# Altium PCB Driver.PcbDoc (part 4 of 4)
Units mm, origin at the board's own origin, x right, y up, seen from the top; angles counter-clockwise.
Board outline 200.2 x 290.2 mm, 2 copper layers (Top Layer, Bottom Layer), stack 1.371 mm thick; 539 components, 196 nets, 1470 pads, 343 vias.
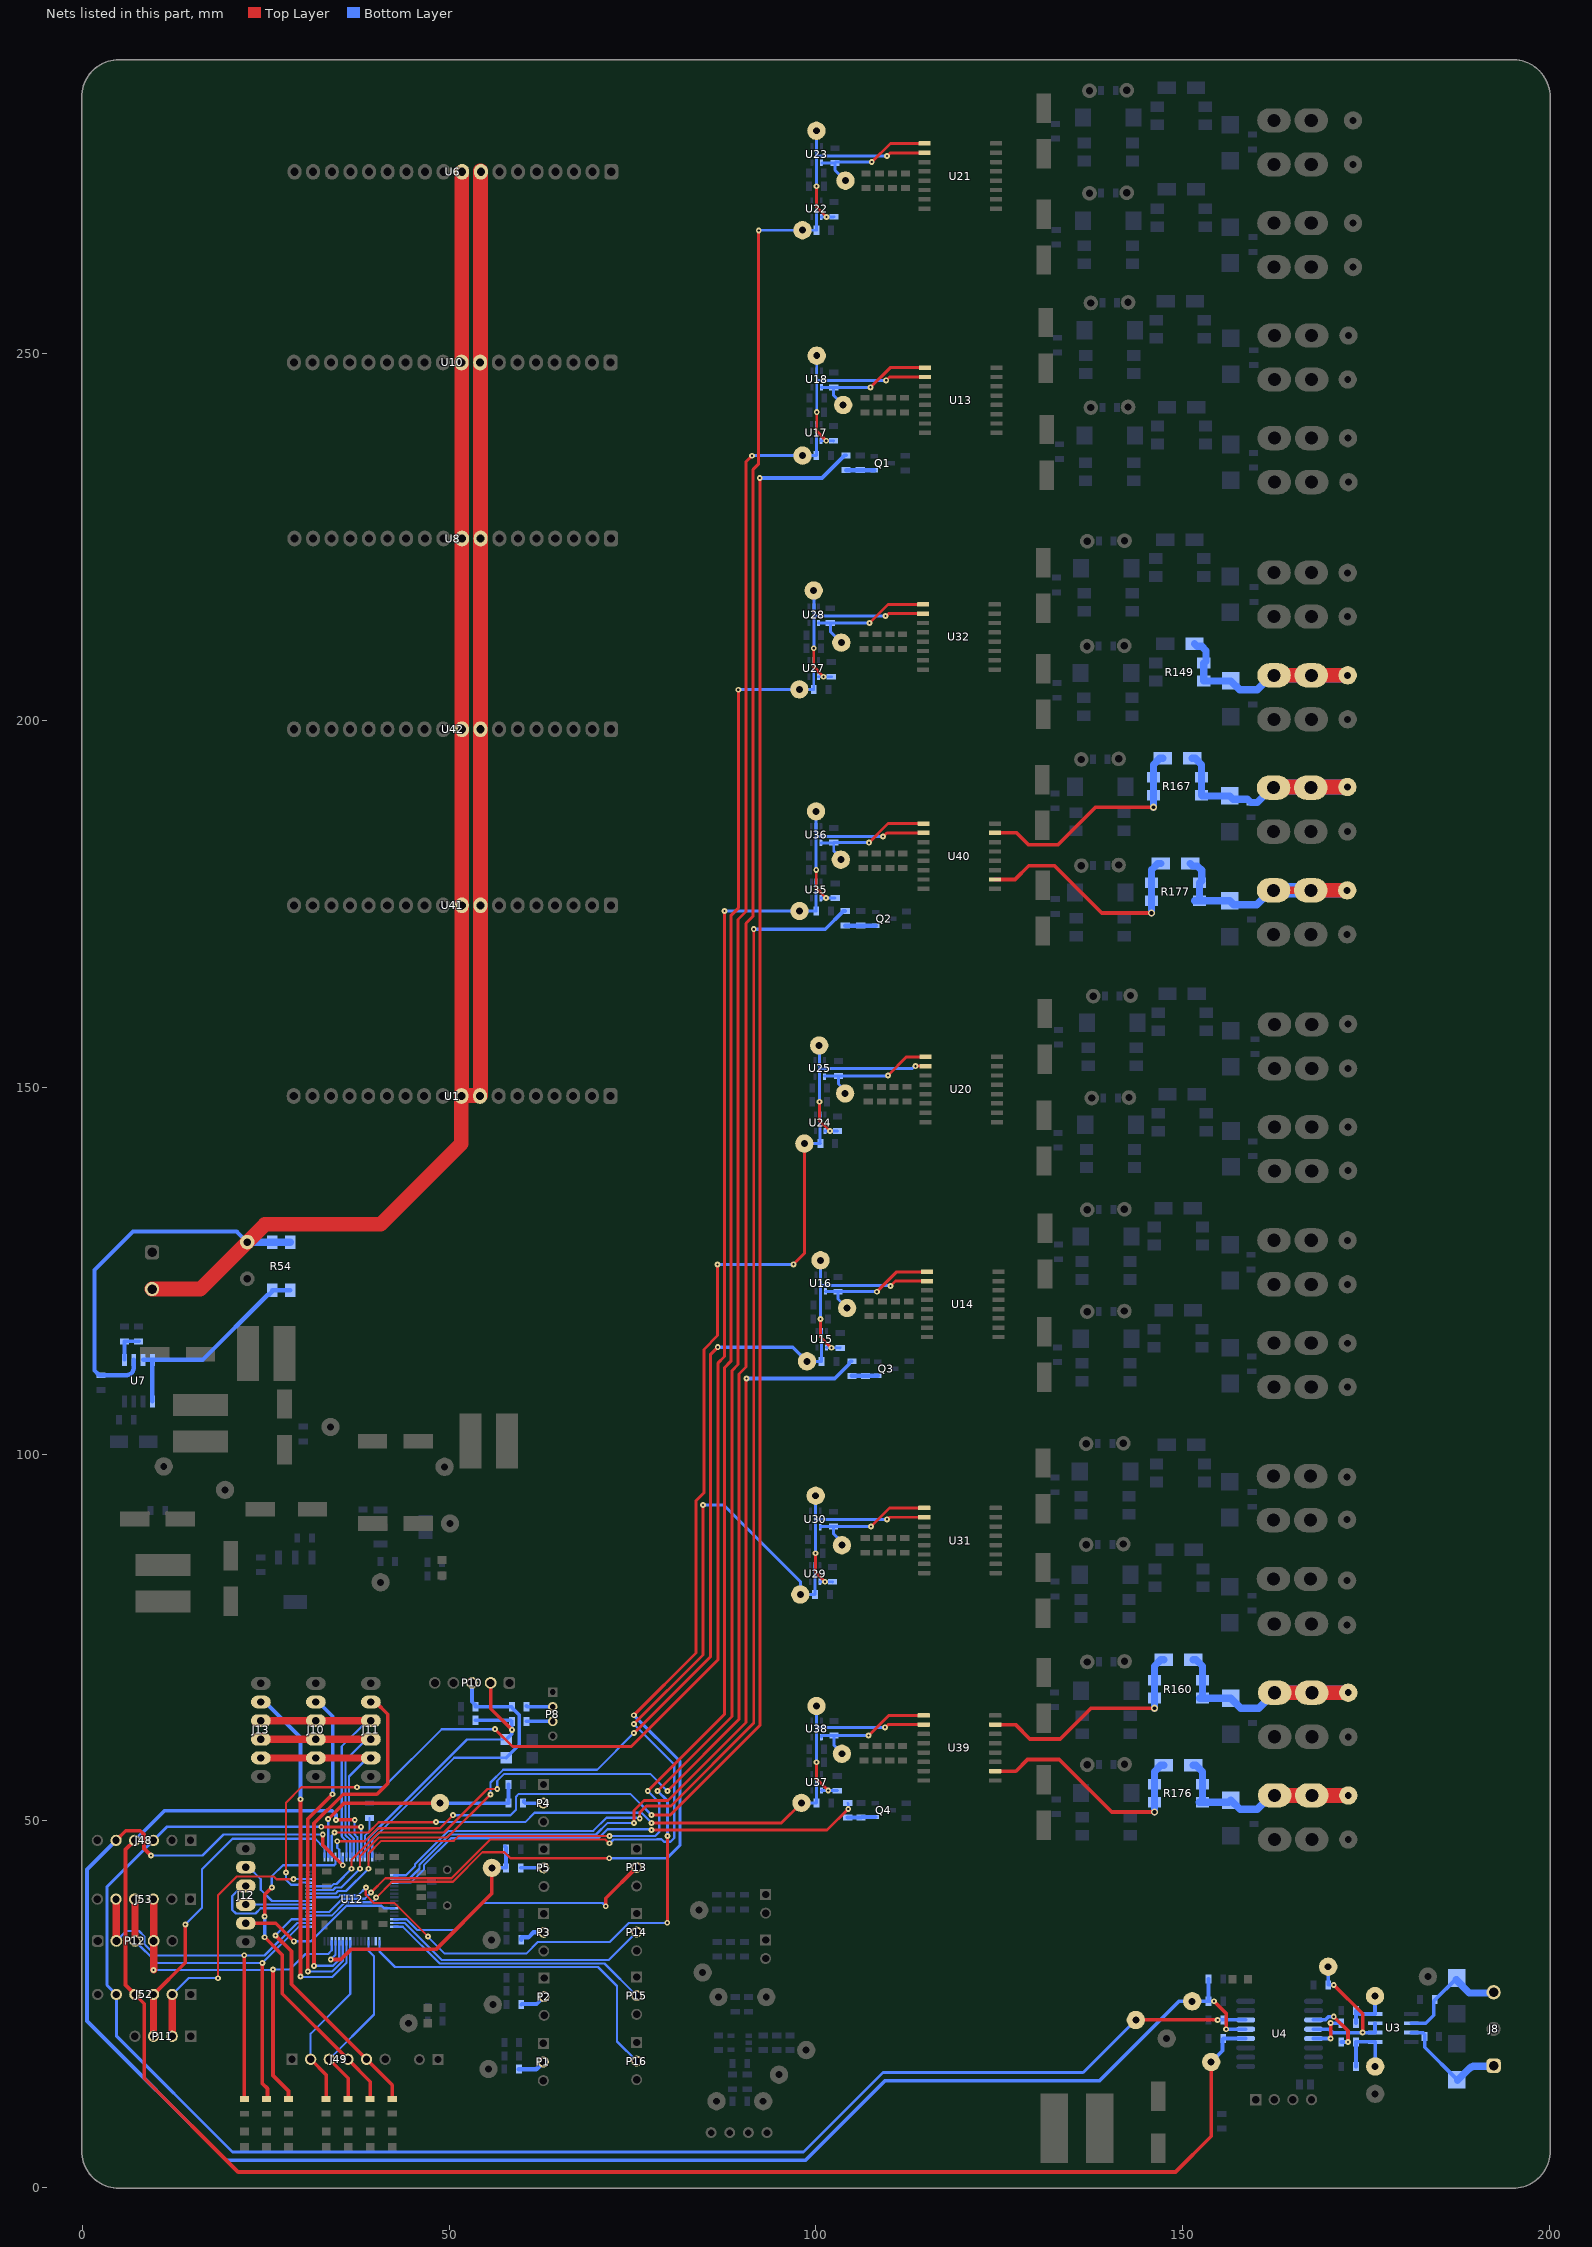
[diagram p4: the nets of this part, all layers, seen from the top]

## Via types
v1: diameter 0.8, hole 0.3, Top Layer to Bottom Layer, tented both sides, 172 vias
v2: diameter 1, hole 0.5, Top Layer to Bottom Layer, tented both sides, 129 vias
v3: diameter 0.8, hole 0.4, Top Layer to Bottom Layer, tented both sides, 25 vias
v4: diameter 2, hole 1, Top Layer to Bottom Layer, tented both sides, 11 vias
v5: diameter 0.8, hole 0.4, Top Layer to Bottom Layer, 3 vias
v6: diameter 1, hole 0.5, Top Layer to Bottom Layer, 1 vias
v7: diameter 0.7, hole 0.3, Top Layer to Bottom Layer, tented both sides, 1 vias
v8: diameter 1.5, hole 1, Top Layer to Bottom Layer, tented both sides, 1 vias

## Nets (pads, with @x,y where several pads share a name; then routed paths per layer and width w, separated by ;. In a path a pad name is that pad's centre, name@x,y a point inside that pad or via, vN(x,y) a via of type N, cw(c..) or ccw(c..) an arc to the next point about the centre after c; other vN are vias at no path point) (continued)
NetD24_2: D24.2 J38.1 R149.2 R152.2 TP86.1 VD25.2 | length 37.2
  Top Layer w2: J38.1@162.46,206.174 J38.1@167.54,206.174 TP86.1@172.5,206.174
  Bottom Layer w1: D24.2@151.61,210.464 151.96,210.114 152.584,210.114 153.17,209.528 153.17,208.064 152.945,207.839 R149.2@152.885,207.839 R149.2@152.885,205.389 156.535,205.389 VD25.2@156.55,205.404 157.77,204.184 R152.2@159.55,204.184 160.187,204.184 162.177,206.174 J38.1@162.46,206.174
  Bottom Layer w2: J38.1@162.46,206.174 J38.1@167.54,206.174 TP86.1@172.5,206.174
NetD25_1: D25.1 R160.1 U39.15 | length 31.7
  Top Layer w0.5: U39.15@124.369,63.12 U39.15@124.449,63.12 127.213,63.12 129.164,61.169 133.312,61.169 137.502,65.359 v2(146.149,65.359)
  Bottom Layer w1: v2(146.149,65.359) R160.1@146.149,66.74 R160.1@146.149,69.19 146.149,71.1 147.024,71.975 D25.1@147.424,71.975
NetD25_2: D25.2 J42.1 R160.2 R168.2 TP98.1 VD28.2 | length 37.8
  Top Layer w2: J42.1@162.534,67.465 J42.1@167.614,67.465 TP98.1@172.574,67.465
  Bottom Layer w1: D25.2@151.424,71.975 151.824,71.975 152.699,71.1 R160.2@152.699,66.74 R160.2@152.744,66.695 ; R160.2@152.314,66.695 VD28.2@156.574,66.695 157.914,65.355 R168.2@159.524,65.355 160.381,65.355 162.491,67.465 J42.1@162.534,67.465
  Bottom Layer w2: J42.1@162.534,67.465 J42.1@167.614,67.465 TP98.1@172.574,67.465
NetD26_1: D26.1 R167.1 U40.15 | length 31.8
  Top Layer w0.5: U40.15@124.428,184.689 127.358,184.689 128.973,183.074 133.019,183.074 138.119,188.174 v2(146.018,188.174)
  Bottom Layer w1: v2(146.018,188.174) R167.1@146.018,189.799 146.018,190.964 R167.1@146.018,192.249 146.018,193.979 146.893,194.854 D26.1@147.293,194.854
NetD26_2: D26.2 J43.1 R167.2 R170.2 TP99.1 VD29.2 | length 37.1
  Top Layer w1: J43.1@162.393,190.854 J43.1@162.473,190.934
  Top Layer w2: J43.1@162.473,190.934 TP99.1@172.453,190.934
  Bottom Layer w1: D26.2@151.293,194.854 151.693,194.854 152.568,193.979 R167.2@152.568,189.799 152.643,189.724 VD29.2@156.433,189.724 156.865,189.292 158.84,189.292 159.308,188.824 R170.2@159.333,188.824 160.16,188.824 162.19,190.854 J43.1@162.393,190.854
  Bottom Layer w2: J43.1@162.393,190.854 162.473,190.934 TP99.1@172.453,190.934
NetD27_1: D27.1 R176.1 U39.10 | length 32.5
  Top Layer w0.5: U39.10@124.369,56.77 U39.10@124.449,56.77 127.264,56.77 128.851,58.357 133.174,58.357 140.336,51.195 v2(146.149,51.195)
  Bottom Layer w1: v2(146.149,51.195) R176.1@146.149,52.54 R176.1@146.149,54.99 146.149,56.69 147.024,57.565 D27.1@147.424,57.565
NetD27_2: D27.2 J46.1 R176.2 R178.2 TP102.1 VD32.2 | length 37.5
  Top Layer w2: J46.1@162.534,53.465 J46.1@167.614,53.465 TP102.1@172.574,53.465
  Bottom Layer w1: D27.2@151.424,57.565 151.824,57.565 152.699,56.69 R176.2@152.699,52.54 ; R176.2@152.269,52.54 156.289,52.54 VD32.2@156.574,52.825 157.814,51.585 R178.2@159.714,51.585 160.162,51.585 162.042,53.465 J46.1@162.534,53.465
  Bottom Layer w2: J46.1@162.534,53.465 J46.1@167.614,53.465 TP102.1@172.574,53.465
NetD28_1: D28.1 R177.1 U40.10 | length 32.3
  Top Layer w0.5: U40.10@124.428,178.339 127.138,178.339 129.003,180.204 132.523,180.204 138.963,173.764 v2(145.748,173.764)
  Bottom Layer w1: v2(145.748,173.764) R177.1@145.748,175.449 R177.1@145.748,177.899 145.748,179.639 146.623,180.514 D28.1@147.023,180.514
NetD28_2: D28.2 J47.1 R177.2 R180.2 TP103.1 VD33.2 | length 38.1
  Top Layer w1: J47.1@162.393,176.854 J47.1@167.473,176.854
  Top Layer w2: J47.1@167.473,176.854 TP103.1@172.433,176.854
  Bottom Layer w1: D28.2@151.023,180.514 151.373,180.164 151.997,180.164 152.583,179.578 152.583,178.124 152.358,177.899 R177.2@152.298,177.899 R177.2@152.298,175.449 R177.2@152.313,175.434 ; R177.2@151.633,175.434 VD33.2@156.433,175.434 156.983,174.884 R180.2@159.403,174.884 160.1,174.884 162.07,176.854 J47.1@162.393,176.854
  Bottom Layer w2: J47.1@162.393,176.854 J47.1@167.473,176.854 TP103.1@172.433,176.854
NetJ8_1: J8.1 R41.2 U3.7 ZD2.1 | length 15.6
  Bottom Layer w0.5: U3.7@181.153,21.132 182.703,21.132 182.99,20.845 182.99,19.128 ZD2.1@187.388,14.731
  Bottom Layer w1: ZD2.1@187.477,14.642 188.001,15.166 189.08,16.245 cw(c189.786,15.537) 189.786,16.537 192.298,16.537 J8.1@192.388,16.627
NetJ8_3: J8.3 R24.1 U3.6 ZD1.1 | length 15.8
  Bottom Layer w0.5: U3.6@181.153,22.402 181.168,22.417 183.142,22.417 184.238,23.513 184.238,25.428 ZD1.1@187.388,28.578
  Bottom Layer w1: ZD1.1@187.301,28.318 189.081,26.537 192.298,26.537 J8.3@192.388,26.627
NetJ10_2: J10.2 J11.2 J13.2 U12.57 | length 30.3
  Top Layer w1: J13.2@24.328,58.577 J10.2@31.828,58.577 J11.2@39.328,58.577
  Bottom Layer w0.3: U12.57@37.007,45.076 37.007,47.584 36.355,48.237 36.355,56.059 38.872,58.577 J11.2@39.328,58.577
NetJ10_3: J10.3 J11.3 J13.3 U12.56 | length 33.1
  Top Layer w1: J13.3@24.328,61.117 J10.3@31.828,61.117 J11.3@39.328,61.117
  Bottom Layer w0.3: U12.56@36.507,45.076 36.507,47.406 35.875,48.038 35.875,58.25 38.742,61.117 J11.3@39.328,61.117
NetJ10_4: J10.4 J11.4 J13.4 U12.55 | length 35.8
  Top Layer w1: J13.4@24.328,63.657 J10.4@31.828,63.657 J11.4@39.328,63.657
  Bottom Layer w0.3: U12.55@36.007,45.076 36.007,47.227 35.395,47.839 35.395,47.886 35.355,47.926 35.355,60.155 38.857,63.657 J11.4@39.328,63.657
NetJ10_5: J10.5 U12.27 | length 47.3
  Top Layer w0.5: v1(30.732,29.482) 30.732,50.243 v1(34.112,53.624)
  Bottom Layer w0.3: v1(30.732,29.482) 34.107,29.482 35.507,30.882 U12.27@35.507,33.576 ; J10.5@31.828,66.197 J10.5@32.167,66.197
  Bottom Layer w0.5: J10.5@32.167,66.197 34.112,64.252 v1(34.112,53.624)
NetJ11_5: J11.5 U12.28 | length 50.4
  Top Layer w0.5: v1(31.582,30.232) 31.582,49.657 35.549,53.624 40.149,53.624 41.614,55.089 41.614,64.532 39.949,66.197 J11.5@39.328,66.197
  Bottom Layer w0.3: v1(31.582,30.232) 34.151,30.232 35.007,31.088 U12.28@35.007,33.576
NetJ12_2: J12.2 U12.40 | length 11.5
  Bottom Layer w0.3: J12.2@22.272,43.667 22.707,43.667 24.326,42.048 24.326,40.588 25.838,39.076 U12.40@31.007,39.076
NetJ12_3: J12.3 U12.38 | length 15.4
  Bottom Layer w0.3: J12.3@22.272,41.127 21.808,41.127 20.432,39.751 20.432,37.857 20.932,37.357 23.607,37.357 24.326,38.076 U12.38@31.007,38.076
NetJ12_4: J12.4 U12.39 | length 8.7
  Bottom Layer w0.3: J12.4@22.272,38.587 22.283,38.576 U12.39@31.007,38.576
NetJ12_5: J12.5 U12.11 | length 23.4
  Top Layer w0.5: J12.5@22.272,36.047 26.354,36.047 v1(28.825,33.576)
  Bottom Layer w0.3: v1(28.825,33.576) 31.159,33.576 36.007,38.424 40.796,38.424 40.992,38.228 41.144,38.076 U12.11@42.507,38.076
NetJ13_5: J13.5 U12.26 | length 50
  Top Layer w0.5: v1(29.725,52.95) 29.732,52.943 v1(29.732,28.782)
  Bottom Layer w0.3: J13.5@24.328,66.197 J13.5@24.892,66.197 ; v1(29.732,28.782) 29.807,28.707 34.057,28.707 36.007,30.657 U12.26@36.007,33.576
  Bottom Layer w0.5: J13.5@24.892,66.197 29.725,61.364 v1(29.725,52.95)
NetJ48_3: J48.3 J52.5 R25.1 TP14.1 U4.6 U12.59 | length 231
  Top Layer w0.4: v1(32.56,49.197) 32.575,49.182 v1(38.001,49.182)
  Top Layer w0.5: TP14.1@143.625,22.862 v1(154.772,22.862)
  Bottom Layer w0.3: v1(38.001,49.182) 38.007,49.176 U12.59@38.007,45.076
  Bottom Layer w0.4: v1(32.56,49.197) 11.532,49.197 J48.3@9.667,47.332 3.357,41.022 3.357,27.597 J52.5@4.622,26.332 4.622,20.703 20.475,4.85 98.325,4.85 109.15,15.675 136.432,15.675 TP14.1@143.607,22.85
  Bottom Layer w0.5: v1(154.772,22.862) R25.1@155.528,22.862 U4.6@158.593,22.862
NetJ48_4: J48.4 J52.4 R28.1 TP11.1 U4.4 U12.58 | length 241.5
  Top Layer w0.5: J48.4@7.127,47.332 5.882,46.087 5.882,27.612 J52.4@7.162,26.332 8.425,25.069 8.425,14.925 21.225,2.125 149.025,2.125 153.888,6.988 TP11.1@153.888,17.127 ; v1(34.581,50.133) v1(37.132,50.133)
  Bottom Layer w0.3: v1(37.132,50.133) 37.107,50.108 37.107,48.163 37.487,47.783 37.487,47.71 37.507,47.69 U12.58@37.507,45.076
  Bottom Layer w0.5: J48.4@7.127,47.332 11.152,51.357 34.077,51.357 34.581,50.853 v1(34.581,50.133) ; TP11.1@153.888,17.127 155.43,18.669 R28.1@155.43,20.224 ; R28.1@155.528,20.322 U4.4@158.593,20.322
NetJ48_5: J48.5 R39.2 R40.2 TP10.1 U4.5 U12.54 | length 245.8
  Top Layer w0.5: J48.5@4.587,47.332 5.905,48.65 7.879,48.65 8.397,48.132 8.397,46.228 v1(9.35,45.275) ; v1(32.771,48.146) 32.75,48.125 32.75,46.7 v1(35.5,43.95) ; v1(154.258,25.402) 155.928,23.732 v1(155.928,21.592)
  Bottom Layer w0.3: v1(9.35,45.275) 16.375,45.275 19.246,48.146 v1(32.771,48.146) ; v1(35.5,43.95) 35.505,43.955 35.505,45.074 U12.54@35.507,45.076
  Bottom Layer w0.5: J48.5@4.587,47.332 0.632,43.377 0.632,22.718 19.625,3.725 98.575,3.725 109.425,14.575 138.675,14.575 149.502,25.402 TP10.1@151.298,25.402 R40.2@153.528,25.402 ; R39.2@153.528,28.437 R40.2@153.528,25.402 ; v1(154.258,25.402) R40.2@153.528,25.402 ; v1(155.928,21.592) U4.5@158.593,21.592
NetJ49_2: J49.2 R13.2 U12.25 | length 24.6
  Top Layer w0.5: J49.2@31.117,17.496 33.257,15.356 R13.2@33.257,12.101
  Bottom Layer w0.3: J49.2@31.117,17.496 31.117,20.992 36.507,26.382 U12.25@36.507,33.576
NetJ49_3: J49.3 R12.2 U12.20 | length 25.4
  Top Layer w0.5: J49.3@33.657,17.496 36.257,14.896 R12.2@36.257,12.101
  Bottom Layer w0.3: J49.3@33.657,17.496 39.757,23.596 39.757,31.526 39.009,32.273 39.009,33.574 U12.20@39.007,33.576
NetJ49_4: J49.4 R11.2 U12.52 | length 47
  Top Layer w0.5: v1(24.85,34.126) 27.25,31.726 27.25,26.443 J49.4@36.197,17.496 39.257,14.436 R11.2@39.257,12.101 ; v1(24.85,36.975) 24.85,39.946 v1(25.828,40.924)
  Bottom Layer w0.3: v1(25.828,40.924) 25.828,42.429 27.349,43.95 34.331,43.95 34.507,44.126 U12.52@34.507,45.076
  Bottom Layer w0.5: v1(24.85,34.126) v1(24.85,36.975)
NetJ49_5: J49.5 R10.2 U12.35 | length 34.5
  Top Layer w0.5: v1(26.325,34.382) 28.5,32.207 28.5,27.733 J49.5@38.737,17.496 42.257,13.976 R10.2@42.257,12.101
  Bottom Layer w0.3: v1(26.325,34.382) 26.325,34.406 28.495,36.576 U12.35@31.007,36.576
NetJ52_2: J52.2 P11.2 U12.46 | length 37.9
  Top Layer w0.3: v1(18.5,28.55) 18.5,39.875 21.032,42.407 26.094,42.407 26.453,42.048 v1(28.775,42.048)
  Top Layer w1: P11.2@12.242,20.632 J52.2@12.242,26.332
  Bottom Layer w0.3: J52.2@12.242,26.332 14.467,28.557 18.493,28.557 v1(18.5,28.55) ; v1(28.775,42.048) 28.803,42.076 U12.46@31.007,42.076
NetJ52_3: J52.3 P11.3 U12.49 | length 45.7
  Top Layer w0.5: J52.3@9.702,26.332 14.032,30.662 v1(14.032,35.857)
  Top Layer w1: P11.3@9.702,20.632 J52.3@9.702,26.332
  Bottom Layer w0.3: v1(14.032,35.857) 16.287,38.112 16.287,43.362 20.475,47.55 31.76,47.55 33.007,46.303 U12.49@33.007,45.076
NetJ53_3: J53.3 P12.4 R7.2 U12.30 | length 54.9
  Top Layer w0.5: v1(25.982,29.732) 25.982,15.291 28.107,13.166 R7.2@28.107,12.076
  Top Layer w1: J53.3@9.657,39.332 9.717,39.272 P12.4@9.717,33.632 9.717,29.697 v1(9.702,29.682)
  Bottom Layer w0.3: v1(9.702,29.682) 25.932,29.682 v1(25.982,29.732) 28.282,29.732 30.407,31.857 33.509,31.857 34.007,32.355 U12.30@34.007,33.576
NetJ53_4: J53.4 P12.3 R8.2 U12.33 | length 51.8
  Top Layer w0.5: v1(24.529,30.607) 24.529,14.198 25.232,13.495 25.232,12.226 R8.2@25.081,12.076
  Top Layer w1: J53.4@7.117,39.332 7.177,39.272 P12.3@7.177,33.632
  Bottom Layer w0.3: P12.3@7.177,33.632 10.202,30.607 v1(24.529,30.607) 29.498,35.576 U12.33@31.007,35.576
NetJ53_5: J53.5 P12.2 R9.2 U12.34 | length 56.2
  Top Layer w0.5: R9.2@22.032,12.076 22.032,12.126 R9.2@22.081,12.076 ; R9.2@22.057,12.126 v1(22.057,31.682)
  Top Layer w1: J53.5@4.577,39.332 4.637,39.272 P12.2@4.637,33.632
  Bottom Layer w0.3: P12.2@4.637,33.632 5.982,34.977 7.723,34.977 8.447,34.253 8.447,33.211 10.026,31.632 22.007,31.632 v1(22.057,31.682) 22.107,31.632 24.832,31.632 29.276,36.076 U12.34@31.007,36.076
NetP1_2: P1.2 R1.1 | length 3.7
  Bottom Layer w0.6: R1.1@59.511,16.147 61.862,16.147 P1.2@62.842,17.127
NetP2_2: P2.2 R2.1 | length 3.6
  Bottom Layer w0.5: R2.1@59.826,24.951 59.91,25.035 61.951,25.035 P2.2@62.943,26.027
NetP3_2: P3.2 R3.1 | length 3.6
  Bottom Layer w0.6: R3.1@59.823,33.784 59.823,34.009 59.923,34.109 60.809,34.109 61.502,34.802 P3.2@62.893,34.802
NetP4_2: P4.2 R22.1 | length 2.9
  Bottom Layer w0.5: R22.1@60.207,52.699 60.207,52.571 60.357,52.421 P4.2@62.867,52.421
NetP5_2: P5.2 R23.1 | length 3.2
  Bottom Layer w0.5: R23.1@59.757,43.591 P5.2@62.917,43.591
NetP8_2: P8.2 R122.2 | length 3.6
  Bottom Layer w0.5: R122.2@60.552,65.661 60.652,65.561 P8.2@64.122,65.561
NetP8_3: P8.3 R123.2 | length 3.6
  Bottom Layer w0.5: R123.2@60.552,63.561 P8.3@64.122,63.561
NetP10_2: P10.2 R121.1 R123.1 U12.61 VD18.1 | length 42.3
  Top Layer w0.5: P10.2@55.662,68.807 55.662,65.298 v1(58.552,62.407)
  Bottom Layer w0.3: U12.61@39.007,45.076 39.007,47.67 52.439,61.101 VD18.1@57.774,61.101
  Bottom Layer w0.5: R121.1@53.592,63.711 58.402,63.711 R123.1@58.552,63.561 ; VD18.1@57.774,61.101 58.552,61.879 v1(58.552,62.407) R123.1@58.552,63.561
NetP10_3: P10.3 R120.1 R122.1 U12.62 VD1.1 | length 41.4
  Bottom Layer w0.3: U12.62@39.507,45.076 39.507,47.434 50.684,58.611 VD1.1@57.774,58.611
  Bottom Layer w0.5: P10.3@53.122,68.807 53.122,66.229 53.415,65.936 53.442,65.936 53.592,65.786 R120.1@53.592,65.561 ; R120.1@53.592,65.561 R122.1@58.552,65.561 ; VD1.1@57.774,58.611 59.552,60.389 59.552,64.436 R122.1@58.702,65.286
NetP13_2: P13.2 U12.14 | length 38.2
  Top Layer w0.5: v1(71.357,38.357) 71.357,39.452 P13.2@75.555,43.65
  Bottom Layer w0.3: U12.14@42.507,36.576 44.184,36.576 45.649,35.111 50.836,35.111 54.526,38.801 70.913,38.801 v1(71.357,38.357)
NetP14_2: P14.2 U12.15 | length 36.7
  Bottom Layer w0.3: U12.15@42.507,36.076 43.938,36.076 48.982,31.032 71.752,31.032 P14.2@75.555,34.835
NetP15_2: P15.2 U12.16 | length 36.9
  Bottom Layer w0.3: U12.16@42.507,35.576 43.688,35.576 48.712,30.552 71.168,30.552 P15.2@75.555,26.165
NetP16_2: P16.2 U12.17 | length 47.1
  Bottom Layer w0.3: U12.17@40.507,33.576 40.507,32.182 42.617,30.072 70.292,30.072 72.88,27.484 72.88,19.925 P16.2@75.555,17.25
NetQ1_1: Q1.1 R84.2 R88.1 | length 3.8
  Bottom Layer w0.6: R84.2@104.119,234.147 Q1.1@107.95,234.147
NetQ2_1: Q2.1 R111.2 R113.1 | length 4.2
  Bottom Layer w0.6: R111.2@103.989,172.037 104.019,172.007 Q2.1@108.141,172.007
NetQ3_1: Q3.1 R140.2 R143.1 | length 3.5
  Bottom Layer w0.6: R140.2@104.905,110.654 104.955,110.704 Q3.1@108.416,110.704
NetQ4_1: Q4.1 R157.2 R159.1 | length 3.8
  Bottom Layer w0.6: R157.2@104.329,50.45 R159.1@106.159,50.45 106.229,50.52 Q4.1@108.079,50.52
NetR22_2: R22.2 R29.2 TP8.1 U12.50 | length 33.4
  Top Layer w0.5: v1(33.507,50.232) 35.696,52.421 TP8.1@48.044,52.421
  Bottom Layer w0.3: U12.50@33.507,45.076 v1(33.507,50.232)
  Bottom Layer w0.5: TP8.1@48.199,52.421 R22.2@58.087,52.421 R29.2@58.087,54.961 ; TP8.1@48.334,52.421 TP8.1@48.439,52.421 ; TP8.1@48.438,52.423 TP8.1@48.439,52.421 ; TP8.1@48.75,52.421 TP8.1@48.439,52.421
NetR23_2: R23.2 R30.2 TP7.1 U12.29 | length 36.9
  Top Layer w0.5: v1(33.855,31.088) 35.238,31.088 36.625,32.475 48.2,32.475 55.823,40.098 TP7.1@55.823,43.591
  Bottom Layer w0.3: v1(33.855,31.088) 34.507,31.74 U12.29@34.507,33.576
  Bottom Layer w0.5: TP7.1@55.823,43.591 R23.2@57.757,43.591 R30.2@57.757,46.131 57.757,46.356 R30.2@57.607,46.506
NetR26_1: R26.1 R32.1 TP9.1 U3.4 | length 6.9
  Bottom Layer w0.5: R32.1@173.618,22.402 R26.1@173.618,23.907 ; R26.1@173.618,24.132 R26.1@173.618,23.907 ; TP9.1@176.223,26.109 U3.4@176.223,23.672 174.078,23.672 173.993,23.757 173.768,23.757 R26.1@173.618,23.907
NetR27_1: R27.1 R36.1 TP16.1 U3.1 | length 9.3
  Bottom Layer w0.5: R27.1@173.618,16.517 R36.1@173.618,19.862 U3.1@176.223,19.862 176.233,19.862 176.248,19.847 TP16.1@176.248,16.517
NetR32_2: R32.2 U4.13 | length 5.9
  Top Layer w0.5: v1(170.173,20.322) v1(170.173,22.422)
  Bottom Layer w0.5: U4.13@167.843,20.322 v1(170.173,20.322) ; v1(170.173,22.422) 170.193,22.402 R32.2@171.618,22.402
NetR36_2: R36.2 U4.11 | length 8.1
  Top Layer w0.5: v1(170.604,23.302) 172.528,21.378 v1(172.528,19.857)
  Bottom Layer w0.5: U4.11@167.843,22.862 169.439,22.862 169.879,23.302 169.962,23.302 169.97,23.31 170.596,23.31 v1(170.604,23.302) ; R36.2@171.618,19.862 171.621,19.86 172.525,19.86 v1(172.528,19.857)
NetR38_2: R38.2 TP13.1 U3.2 U3.3 U4.12 | length 21.2
  Top Layer w0.5: v1(170.604,27.637) 174.538,23.703 v1(174.538,21.132)
  Bottom Layer w0.5: U4.12@167.843,21.592 169.953,21.592 170.413,21.132 v1(174.538,21.132) U3.2@176.223,21.132 U3.3@176.223,22.402 ; TP13.1@169.838,30.111 R38.2@169.838,27.637 v1(170.604,27.637)
NetR54_2: R54.2 U7.1 U7.7 U7.8 | length 29.7
  Bottom Layer w0.6: U7.7@8.275,112.834 U7.8@9.545,112.834 ; U7.1@9.545,107.184 U7.8@9.545,112.834 ; R54.2@25.875,122.325 R54.2@28.325,122.325 ; R54.2@25.963,122.237 25.45,121.725 25.275,121.725 16.384,112.834 U7.8@9.545,112.834
NetR56_2: R56.2 R57.2 U7.5 | length 4.5
  Bottom Layer w0.5: U7.5@5.74,112.839 R57.2@5.74,115.369 R56.2@7.734,115.369
NetR59_2: R59.2 U12.60 | length 5.6
  Bottom Layer w0.3: U12.60@38.507,45.076 38.507,47.957 39.159,48.609 R59.2@39.159,50.407
NetR66_2: R66.2 TP40.1 U12.43 U15.2 | length 131.4
  Top Layer w0.3: v1(37.855,43.473) 37.855,45.17 40.434,47.75 49.775,47.75 v1(55.625,53.6)
  Top Layer w0.4: v1(75.175,61.975) 75.225,61.975 85.6,72.35 85.6,113.55 v1(86.625,114.575)
  Bottom Layer w0.3: U12.43@31.007,40.576 34.159,40.576 34.507,40.924 35.305,40.924 v1(37.855,43.473) ; v1(55.625,53.6) 55.625,55.225 57.375,56.975 70.175,56.975 v1(75.175,61.975)
  Bottom Layer w0.4: TP40.1@98.779,112.644 R66.2@100.785,112.644 ; U15.2@100.771,116.769 100.771,112.658 R66.2@100.785,112.644
  Bottom Layer w0.5: v1(86.625,114.575) 96.848,114.575 TP40.1@98.779,112.644
NetR67_2: R67.2 TP42.1 U12.41 U17.2 | length 274.4
  Top Layer w0.3: v1(38.659,40.924) 38.625,40.889 38.625,39.911 39.75,38.786 42.564,38.786 v1(47.1,34.25)
  Top Layer w0.4: v1(78.4,54.075) 88.55,64.225 88.55,111.375 89.375,112.2 89.375,172.875 90.455,173.955 90.455,235.28 v1(91.275,236.1) ; v1(79.725,36.1) 79.75,36.125 v1(79.75,47.95)
  Bottom Layer w0.3: U12.41@31.007,39.576 34.855,39.576 35.142,39.864 37.599,39.864 v1(38.659,40.924) ; v1(47.1,34.25) 47.1,34.2 49.4,31.9 60.5,31.9 62.075,33.475 71.875,33.475 74.475,36.075 79.7,36.075 v1(79.725,36.1)
  Bottom Layer w0.4: v1(78.4,54.075) 79.75,52.725 v1(79.75,47.95) ; v1(91.275,236.1) 91.296,236.121 R67.2@100.051,236.121 100.051,240.073 100.061,240.083 U17.2@100.061,240.396
NetR68_2: R68.2 TP37.1 U14.2 U15.4 U16.2 | length 29.3
  Top Layer w0.4: v1(100.636,118.419) 100.636,115.969 102.101,114.504 v1(102.121,114.504) ; v1(110.187,122.919) 110.846,123.579 U14.2@115.141,123.579
  Bottom Layer w0.4: v1(100.636,118.419) 100.636,123.009 ; TP37.1@100.636,126.419 U16.2@100.636,124.434 100.636,123.009 ; U15.4@101.421,114.519 101.421,114.511 102.114,114.511 v1(102.121,114.504) 102.131,114.494 103.299,114.494 R68.2@103.309,114.484 ; v1(110.187,122.919) 110.11,122.996 109.827,122.996 109.814,123.009 100.636,123.009
NetR69_2: R69.2 TP41.1 U14.1 U16.4 | length 17.7
  Top Layer w0.4: v1(108.303,122.139) 111.013,124.849 U14.1@115.141,124.849
  Bottom Layer w0.4: U16.4@101.286,122.184 102.961,122.184 R69.2@103.006,122.139 ; TP41.1@104.256,119.909 103.006,121.159 R69.2@103.006,122.139 ; v1(108.303,122.139) R69.2@103.006,122.139
NetR70_2: R70.2 TP38.1 U13.2 U17.4 U18.2 | length 28.8
  Top Layer w0.4: v1(100.112,242.041) 100.112,239.445 v1(101.411,238.146) ; v1(109.577,246.382) 110.036,246.841 U13.2@114.886,246.841
  Bottom Layer w0.4: v1(100.112,242.041) 100.112,246.358 ; TP38.1@100.112,249.741 U18.2@100.112,247.686 100.112,246.358 ; U17.4@100.711,238.146 v1(101.411,238.146) 101.413,238.143 102.388,238.143 R70.2@102.391,238.141 ; v1@109.553,246.358 100.112,246.358
NetR71_2: R71.2 TP43.1 U13.1 U18.4 | length 18.5
  Top Layer w0.4: v1(107.445,245.431) 110.127,248.113 U13.1@114.887,248.113
  Bottom Layer w0.4: U18.4@100.762,245.436 100.762,245.431 R71.2@102.421,245.431 ; TP43.1@103.941,242.803 102.421,244.323 R71.2@102.421,245.431 ; v1(107.445,245.431) R71.2@102.421,245.431
NetR84_1: R84.1 U12.53 | length 252.9
  Top Layer w0.3: v1(34.737,47.227) 38.507,47.227 40.28,49 48.75,49 v1(50.525,50.775)
  Top Layer w0.4: v1(77.575,50.8) 80.15,50.8 92.35,63 v1(92.35,233.075)
  Bottom Layer w0.3: v1(34.737,47.227) 34.737,46.338 35.007,46.068 U12.53@35.007,45.076 ; v1(50.525,50.775) 58.35,50.775 59.1,51.525 59.1,53.272 59.503,53.675 74.7,53.675 v1(77.575,50.8)
  Bottom Layer w0.5: v1(92.35,233.075) 100.822,233.075 103.894,236.147 R84.1@104.119,236.147
NetR97_2: R97.2 TP57.1 U12.44 U22.2 | length 287.3
  Top Layer w0.3: v1(36.7,43.473) 36.7,44.694 40.406,48.4 49.3,48.4 55.236,54.336 v1(56.55,54.336)
  Top Layer w0.4: v1(79.75,54.075) 89.525,63.85 89.525,110.925 90.455,111.855 90.455,172.355 91.45,173.35 91.45,234.256 92.2,235.006 v1(92.2,266.825)
  Bottom Layer w0.3: U12.44@31.007,41.076 33.926,41.076 34.254,41.404 34.631,41.404 v1(36.7,43.473) ; v1(56.55,54.336) 56.55,55.45 57.501,56.401 77.424,56.401 v1(79.75,54.075)
  Bottom Layer w0.4: v1(92.2,266.825) 92.222,266.847 R97.2@100.06,266.847 100.08,266.867 U22.2@100.08,270.902
NetR98_2: R98.2 TP59.1 U12.36 U24.2 | length 175.3
  Top Layer w0.3: v1(40.048,39.535) 42.212,41.7 50.525,41.7 54.531,45.705 57.558,45.705 58.363,44.9 v1(71.825,44.9)
  Top Layer w0.4: v1(75.175,64.4) 83.65,72.875 83.65,93.65 84.725,94.725 84.725,114.275 86.6,116.15 v1(86.6,125.85) ; v1(96.95,125.867) 98.423,127.34 TP59.1@98.423,142.329
  Bottom Layer w0.3: U12.36@31.007,37.076 33.981,37.076 35.808,38.904 39.487,38.904 40.048,39.464 v1(40.048,39.535)
  Bottom Layer w0.4: v1(71.825,44.9) 79.7,44.9 81.5,46.7 81.5,58.075 v1(75.175,64.4) ; v1(86.6,125.85) 86.617,125.867 v1(96.95,125.867) ; TP59.1@98.423,142.329 R98.2@100.614,142.329 100.564,142.379 U24.2@100.564,146.294
NetR99_2: R99.2 TP53.1 U21.2 U22.4 U23.2 | length 29
  Top Layer w0.4: v1(100.08,272.84) 100.08,270.001 v1(101.43,268.652) ; v1(109.688,276.953) 110.125,277.39 114.798,277.39 U21.2@114.815,277.408
  Bottom Layer w0.4: TP53.1@100.061,280.404 TP53.1@100.064,280.407 100.087,280.383 U23.2@100.087,278.307 100.087,276.953 ; v1@100.087,272.847 100.087,276.953 ; U22.4@100.73,268.652 v1(101.43,268.652) 102.425,268.652 R99.2@102.46,268.686 ; v1(109.688,276.953) 100.087,276.953
NetR100_2: R100.2 TP58.1 U21.1 U23.4 | length 18.1
  Top Layer w0.4: v1(107.609,276.138) 110.149,278.678 U21.1@114.815,278.678
  Bottom Layer w0.4: U23.4@100.807,276.033 102.584,276.033 R100.2@102.59,276.027 ; TP58.1@104.02,273.602 102.59,275.033 R100.2@102.59,276.027 ; v1(107.609,276.138) 102.701,276.138 R100.2@102.59,276.027
NetR101_2: R101.2 TP54.1 U20.2 U24.4 U25.2 | length 28.6
  Top Layer w0.4: v1(100.507,148.03) 100.462,147.985 100.462,145.496 v1(101.914,144.044) ; v1(113.564,152.884) U20.2@114.939,152.884
  Bottom Layer w0.4: TP54.1@100.444,155.709 100.507,155.646 U25.2@100.507,153.694 100.507,153.381 100.504,153.378 100.504,152.55 ; v1(100.507,148.03) 100.507,151.321 100.504,151.324 100.504,152.55 ; U24.4@101.214,144.044 v1(101.914,144.044) 101.916,144.041 102.931,144.041 R101.2@102.934,144.039 ; v1(113.564,152.884) 113.463,152.884 113.129,152.55 100.504,152.55
NetR102_2: R102.2 TP60.1 U20.1 U25.4 | length 17.6
  Top Layer w0.4: v1(109.824,151.614) 112.364,154.154 U20.1@114.939,154.154
  Bottom Layer w0.4: U25.4@101.157,151.564 102.934,151.564 R102.2@103.095,151.564 ; TP60.1@103.984,149.169 103.984,149.564 103.095,150.453 R102.2@103.095,151.564 ; v1(109.824,151.614) 109.774,151.564 R102.2@103.095,151.564
NetR111_1: R111.1 U12.2 | length 180.1
  Top Layer w0.4: v1(75.984,50.309) 75.984,51.134 76.875,52.025 80.225,52.025 91.525,63.325 v1(91.525,171.562)
  Bottom Layer w0.3: U12.2@42.507,42.576 44.12,42.576 45.348,43.804 45.348,44.08 49.897,48.63 69.655,48.63 71.45,50.425 75.558,50.425 75.579,50.404 75.888,50.404 v1(75.984,50.309)
  Bottom Layer w0.5: v1(91.525,171.562) 91.537,171.55 101.277,171.55 103.764,174.037 R111.1@103.989,174.037
NetR125_2: R125.2 TP73.1 U12.42 U27.2 | length 228.1
  Top Layer w0.3: v1(39,43.473) 39,45.543 40.727,47.27 50.621,47.27 51.301,47.95 v1(71.85,47.95)
  Top Layer w0.4: v1(77.075,54.075) 87.525,64.525 87.525,111.775 88.4,112.65 88.4,173.4 89.425,174.425 v1(89.425,204.2)
  Bottom Layer w0.3: U12.42@31.007,40.076 34.507,40.076 34.855,40.424 35.951,40.424 v1(39,43.473) ; v1(71.85,47.95) 78.125,47.95 78.65,48.475 78.65,52.5 v1(77.075,54.075)
  Bottom Layer w0.4: v1(89.425,204.2) 89.476,204.251 R125.2@99.701,204.252 ; R125.2@99.701,204.252 U27.2@99.701,208.226
NetR126_2: R126.2 TP75.1 U12.37 U29.2 | length 132.1
  Top Layer w0.3: v1(39.355,40.228) 41.306,42.18 50.326,42.18 55.617,47.47 71.298,47.47 71.828,46.94 v1(71.85,46.94)
  Top Layer w0.4: v1(75.175,63.2) 84.6,72.625 v1(84.6,93.05)
  Bottom Layer w0.3: U12.37@31.007,37.576 31.009,37.574 33.657,37.574 35.467,39.384 38.51,39.384 v1(39.355,40.228) ; v1(71.85,46.94) 71.872,46.94 72.402,47.47 78.324,47.47 78.334,47.48 78.942,47.48 79.28,47.142 80.167,47.142 80.7,47.675 80.7,57.675 v1(75.175,63.2)
  Bottom Layer w0.4: v1(84.6,93.05) 87.45,93.05 97.871,82.629 TP75.1@97.871,80.857 ; TP75.1@97.302,80.857 TP75.1@97.871,80.857 ; U29.2@99.879,84.842 99.879,80.877 R126.2@99.899,80.857 TP75.1@97.871,80.857
NetR127_2: R127.2 TP71.1 U27.4 U28.2 U32.2 | length 29.1
  Top Layer w0.4: v1(99.701,209.861) 99.701,207.326 v1(101.051,205.976) ; v1(109.47,214.269) 109.578,214.269 109.878,214.569 U32.2@114.625,214.569
  Bottom Layer w0.4: v1(99.701,209.861) 99.731,209.891 99.731,214.269 ; TP71.1@99.701,217.731 99.731,217.701 U28.2@99.731,215.556 99.731,214.269 ; U27.4@100.351,205.976 R127.2@102.101,205.976 ; v1(109.47,214.269) 99.731,214.269
NetR128_2: R128.2 TP74.1 U28.4 U32.1 | length 18.6
  Top Layer w0.4: v1(107.302,213.311) 109.83,215.839 U32.1@114.625,215.839
  Bottom Layer w0.4: U28.4@100.381,213.306 101.975,213.306 101.98,213.311 v1(107.302,213.311) ; R128.2@101.961,213.306 101.961,212.123 TP74.1@103.461,210.623 ; TP74.1@103.793,211.581 TP74.1@103.805,211.593
NetR129_2: R129.2 TP72.1 U29.4 U30.2 U31.2 | length 29
  Top Layer w0.4: v1(99.939,86.487) 99.939,83.881 v1(101.229,82.592) ; v1(109.689,91.105) 109.797,91.105 110.08,91.388 114.766,91.388 U31.2@114.769,91.39
  Bottom Layer w0.4: v1(99.939,86.487) 99.939,91.105 ; TP72.1@99.993,94.347 99.939,94.293 U30.2@99.939,92.262 99.939,91.105 ; U29.4@100.529,82.592 v1(101.229,82.592) 102.265,82.592 R129.2@102.269,82.587 ; v1(109.689,91.105) 99.939,91.105
NetR130_2: R130.2 TP76.1 U30.4 U31.1 | length 18.7
  Top Layer w0.4: v1(107.496,90.137) 110.02,92.66 U31.1@114.769,92.66
  Bottom Layer w0.4: U30.4@100.589,90.012 100.589,90.123 R130.2@102.383,90.123 ; TP76.1@103.539,87.249 103.539,87.975 102.383,89.131 R130.2@102.383,90.123 ; v1(107.496,90.137) R130.2@102.382,90.137 R130.2@102.383,90.123
NetR140_1: R140.1 U12.3 | length 120.5
  Top Layer w0.4: v1(75.199,49.695) 75.204,49.7 75.204,51.404 76.575,52.775 79.85,52.775 90.484,63.409 90.484,110.259 v1(90.525,110.3)
  Bottom Layer w0.3: U12.3@42.507,42.076 44.53,42.076 45.95,43.496 45.95,43.994 46.072,44.116 46.072,44.126 50.056,48.11 50.066,48.11 50.106,48.15 70.03,48.15 71.605,49.725 75.169,49.725 v1(75.199,49.695)
  Bottom Layer w0.5: v1(90.525,110.3) 102.552,110.3 104.53,112.279 104.53,112.504 104.68,112.654 R140.1@104.905,112.654
NetR157_1: R157.1 U12.4 | length 67.3
  Top Layer w0.4: v1(77.575,48.745) 77.58,48.75 101.525,48.75 v1(104.4,51.625)
  Bottom Layer w0.3: U12.4@42.507,41.576 44.781,41.576 46.552,43.347 46.552,43.927 50.255,47.63 70.355,47.63 71.575,48.85 77.149,48.85 77.159,48.84 77.479,48.84 v1(77.575,48.745) ; R157.1@104.329,52.45 104.4,52.379 v1(104.4,51.625)
NetR161_2: R161.2 TP94.1 U12.45 U35.2 | length 202.1
  Top Layer w0.3: v1(27.75,42.975) 27.75,52.475 29.85,54.575 v1(37.45,54.575)
  Top Layer w0.4: v1(56.25,62.5) 58.625,60.125 74.825,60.125 86.625,71.925 86.625,112.375 87.55,113.3 v1(87.55,174.05)
  Bottom Layer w0.3: v1(27.75,42.975) 27.75,41.973 28.448,41.275 29.4,41.275 29.701,41.576 U12.45@31.007,41.576 ; v1(37.45,54.575) 41.05,54.575 48.975,62.5 v1(56.25,62.5)
  Bottom Layer w0.4: v1(87.55,174.05) 87.558,174.042 TP94.1@97.757,174.042 R161.2@100.044,174.042 100.027,174.059 U35.2@100.027,178.037
NetR162_2: R162.2 TP96.1 U12.51 U37.2 | length 76
  Top Layer w0.3: v1(34.355,48.402) 39.003,48.402 40.402,49.801 v1@48.225,49.801
  Top Layer w0.4: v1(77.575,49.725) 77.6,49.7 95.273,49.7 TP96.1@98.024,52.45
  Bottom Layer w0.3: U12.51@34.007,45.076 34.007,47.976 34.355,48.324 v1(34.355,48.402) ; v1(48.225,49.825) 60.358,49.825 61.64,51.108 76.217,51.108 77.575,49.75 v1(77.575,49.725)
  Bottom Layer w0.4: TP96.1@98.024,52.45 R162.2@100.084,52.45 U37.2@100.084,56.39
NetR163_2: R163.2 TP89.1 U35.4 U36.2 U40.2 | length 29.3
  Top Layer w0.4: v1(100.044,179.652) 100.044,177.135 v1(101.377,175.802) ; v1@109.151,184.176 109.664,184.689 U40.2@114.678,184.689
  Bottom Layer w0.4: TP89.1@100.017,187.622 U36.2@100.017,185.587 100.017,184.462 ; v1(100.044,179.652) 100.017,179.679 100.017,184.462 ; U35.4@100.677,175.787 100.677,175.794 101.37,175.794 v1(101.377,175.802) R163.2@102.627,175.802 ; v1@109.15,184.175 100.304,184.175 100.017,184.462
  other v1: 109.151,184.174
NetR164_2: R164.2 TP95.1 U36.4 U40.1 | length 17.9
  Top Layer w0.4: v1(107.225,183.352) 109.832,185.959 U40.1@114.678,185.959
  Bottom Layer w0.4: U36.4@100.667,183.337 102.412,183.337 R164.2@102.427,183.352 ; TP95.1@103.252,180.93 103.252,181.389 102.427,182.214 R164.2@102.427,183.352 ; v1(107.225,183.352) R164.2@102.427,183.352
NetR165_2: R165.2 TP93.1 U37.4 U38.2 U39.2 | length 29.2
  Top Layer w0.4: v1(100.084,57.98) 100.084,55.725 v1(101.684,54.125) ; v1(109.422,62.751) 109.487,62.751 109.857,63.12 U39.2@114.699,63.12
  Bottom Layer w0.4: v1(100.084,57.98) 100.084,62.705 ; TP93.1@100.084,65.65 U38.2@100.084,63.655 100.084,62.705 ; U37.4@100.734,54.14 100.734,54.125 v1(101.684,54.125) 101.691,54.118 102.906,54.118 R165.2@102.914,54.11 ; v1(109.422,62.751) 109.377,62.705 100.084,62.705
NetR166_2: R166.2 TP97.1 U38.4 U39.1 | length 18
  Top Layer w0.4: v1(107.189,61.62) 109.959,64.39 U39.1@114.699,64.39
  Bottom Layer w0.4: U38.4@100.734,61.405 100.734,61.62 v1(107.189,61.62) ; R166.2@102.444,61.4 102.444,60.335 103.539,59.24 TP97.1@103.539,59.145
NetU12_18: U12.18
VCC: C41.1 C47.1 J9.2 R54.1 U1.8 U1.9 U6.8 U6.9 U7.6 U8.8 U8.9 U10.8 U10.9 U41.8 U41.9 U42.8 U42.9 | length 361.8
  Top Layer w2: J9.2@9.5,122.5 16.075,122.5 24.904,131.329 40.67,131.329 51.67,142.329 U1.9@51.67,148.815 ; U6.9@51.73,274.815 U42.9@51.73,198.815 51.73,148.875 54.27,148.875 U42.8@54.27,198.815 54.27,248.815 54.27,274.815 U6.8@54.27,274.942
  Bottom Layer w0.6: U7.6@7.005,112.834 7.005,111.789 cw(c5.965,111.789) 5.965,110.749 2.295,110.749 1.65,111.394 1.65,125.1 6.9,130.35 21.025,130.35 C47.1@22.475,128.9
  Bottom Layer w1: C47.1@22.475,128.9 22.5,128.875 R54.1@25.875,128.875 R54.1@28.325,128.875
pads on no net: U1.5 U1.6 U1.7 U1.12 U1.13 U1.14 U4.3 U4.14 U6.5 U6.6 U6.7 U6.12 U6.13 U6.14 U8.5 U8.6 U8.7 U8.12 U8.13 U8.14 U10.5 U10.6 U10.7 U10.12 U10.13 U10.14 U13.7 U13.12 U13.13 U14.7 U14.12 U14.13 U20.7 U20.12 U20.13 U21.7 U21.12 U21.13 U31.7 U31.12 U31.13 U32.7 U32.12 U32.13 U39.7 U39.12 U39.13 U40.7 U40.12 U40.13 U41.5 U41.6 U41.7 U41.12 U41.13 U41.14 U42.5 U42.6 U42.7 U42.12 U42.13 U42.14

## Polygon pours and split planes (outlines as drawn)
GND on Top Layer "NONET_L-01_P-001" (solid, pour order 18): 0.005,137.35 60.85,137.35 60.85,97.35 54.593,91.093 54.593,86.476 61.525,79.544 82.425,58.644 82.425,49.75 91.46,40.715 94.135,40.715 102.725,32.125 161.145,32.125 161.145,-0.1 17.541,-0.1 17.541,-0.003 -0.101,17.639
GND on Top Layer "NONET_L-01_P-001" (solid, pour order 16): 96.775,67.45 96.775,53.4 100.084,50.05 115.638,50.05 115.638,67.45
GND_2 on Top Layer "NONET_L-01_P-001" (solid, pour order 14): 165.028,32.125 165.028,-0.1 180.531,-0.1 196.336,15.704 196.336,27.814 192.025,32.125
GND on Top Layer "NONET_L-01_P-001" (solid, pour order 13): 96.374,127.45 96.374,110.098 116.002,110.098 116.002,127.45
GND on Top Layer "NONET_L-01_P-001" (solid, pour order 10): 95.803,188.914 95.803,171.562 115.431,171.562 115.431,188.914
GND on Top Layer "NONET_L-01_P-001" (solid, pour order 8): 96.085,250.975 96.085,233.623 115.712,233.623 115.712,250.975
GND on Top Layer "NONET_L-01_P-001" (solid, pour order 6): 96.561,94.319 96.561,79.673 116.031,79.673 116.031,94.319
GND on Top Layer "NONET_L-01_P-001" (solid, pour order 4): 97.173,155.473 97.173,141.075 116.497,141.075 116.497,155.473
GND on Top Layer "NONET_L-01_P-001" (solid, pour order 2): 97.093,217.283 97.093,203.373 116.22,203.373 116.22,217.283
GND on Top Layer "NONET_L-01_P-001" (solid, pour order 1): 96.462,279.486 96.462,265.575 115.589,265.575 115.589,279.486
GND on Bottom Layer "NONET_L-01_P-001" (solid, pour order 19): 0.106,137.4 31.15,137.4 39.425,129.125 39.425,111.7 54.475,96.65 54.475,86.694 82.525,58.644 82.525,49.75 91.56,40.715 94.235,40.715 102.825,32.125 161.145,32.125 161.145,-0.1 17.642,-0.1 17.642,-0.003 0,17.639
GND on Bottom Layer "NONET_L-01_P-001" (solid, pour order 3): 97.093,217.283 97.093,203.373 116.22,203.373 116.22,217.283
GND on Bottom Layer "NONET_L-01_P-001" (solid, pour order 11): 95.92,188.877 95.92,171.526 115.547,171.526 115.547,188.877
GND on Bottom Layer "NONET_L-01_P-001" (solid, pour order 7): 96.596,94.319 96.596,79.673 116.066,79.673 116.066,94.319
GND on Bottom Layer "NONET_L-01_P-001" (solid, pour order 12): 96.407,127.417 96.407,110.066 116.034,110.066 116.034,127.417
GND on Bottom Layer "NONET_L-01_P-001" (solid, pour order 17): 96.795,67.45 96.795,53.4 100.104,50.05 115.658,50.05 115.658,67.45
GND_2 on Bottom Layer "NONET_L-01_P-001" (solid, pour order 15): 165.009,-0.1 180.531,-0.1 196.336,15.704 196.336,27.814 192.025,32.125 165.042,32.125
GND on Bottom Layer "NONET_L-01_P-001" (solid, pour order 9): 96.085,250.975 96.085,233.623 115.712,233.623 115.712,250.975
GND on Bottom Layer "NONET_L-01_P-001" (solid, pour order 5): 97.173,155.473 97.173,141.075 116.497,141.075 116.497,155.473
GND on Bottom Layer "NONET_L-01_P-001" (solid, pour order 0): 96.462,279.486 96.462,265.575 115.589,265.575 115.589,279.486

## Keep-outs
Keep-Out Layer:
  circle w0.254: c195,5 r2
  circle w0.254: c5,5 r2
  circle w0.254: c195,285 r2
  circle w0.254: c5,145 r2
  circle w0.254: c195,145 r2
  circle w0.254: c5,285 r2
  lines w0.2: 118.023,186.721 118.023,176.124 ccw(c119.523,176.124) 121.023,176.124 121.023,186.723 ccw(c119.523,186.723) 118.023,186.723 ; 118.03,216.74 118.03,206.144 ccw(c119.53,206.144) 121.03,206.144 121.03,216.743 ccw(c119.53,216.743) 118.03,216.743 ; 118.094,65.402 118.094,54.806 ccw(c119.594,54.806) 121.094,54.806 121.094,65.405 ccw(c119.594,65.405) 118.094,65.405 ; 118.23,279.529 118.23,268.933 ccw(c119.73,268.933) 121.23,268.933 121.23,279.532 ccw(c119.73,279.532) 118.23,279.532 ; 118.234,93.552 118.234,82.956 ccw(c119.734,82.956) 121.234,82.956 121.234,93.555 ccw(c119.734,93.555) 118.234,93.555 ; 118.292,249.014 118.292,238.418 ccw(c119.792,238.418) 121.292,238.418 121.292,249.017 ccw(c119.792,249.017) 118.292,249.017 ; 118.334,155.086 118.334,144.489 ccw(c119.834,144.489) 121.334,144.489 121.334,155.089 ccw(c119.834,155.089) 118.334,155.089 ; 118.585,125.64 118.585,115.044 ccw(c120.085,115.044) 121.585,115.044 121.585,125.643 ccw(c120.085,125.643) 118.585,125.643 ; 195,290 cw(c195,285) 200,285 200,5 cw(c195,5) 195,0 5,0 cw(c5,5) 0,5 0,285 cw(c5,285) 5,290 195.11,290

## Silkscreen, mask and mechanical layers (free items; w line width, h text height)
Top Overlay:
  circle w2: c5,5 r3
  circle w2: c195,5 r3
  circle w2: c195,285 r3
  circle w2: c5,145 r3
  circle w2: c195,145 r3
  circle w2: c5,285 r3
  rectangle: 164.818,161.199 184.818,168.199
  rectangle: 165,222.863 185,229.863
  rectangle: 164.964,99.555 184.964,106.555
  lines w0.2: 1.925,56.925 9.925,56.925 ; 1.95,62.05 9.95,62.05 ; 1.95,67.05 9.95,67.05
  lines w0.5: 164.871,94.049 184.871,94.049 ; 164.921,79.929 184.921,79.929 ; 164.964,278.816 184.964,278.816 ; 165.031,64.439 185.031,64.439 ; 165.134,264.926 185.134,264.926 ; 165.147,217.257 185.147,217.257 ; 165.151,50.469 185.151,50.469 ; 165.197,203.137 185.197,203.137 ; 165.241,155.512 185.241,155.512 ; 165.244,249.436 185.244,249.436 ; 165.291,141.392 185.291,141.392 ; 165.307,187.647 185.307,187.647 ; 165.364,235.466 185.364,235.466 ; 165.401,125.902 185.401,125.902 ; 165.421,112.132 185.421,112.132 ; 165.427,173.677 185.427,173.677 ; 169.061,160.709 179.484,160.709 179.484,106.984 169.205,106.984 ; 169.256,99.144 179.834,99.144 179.834,45.265 169.555,45.265 ; 169.32,284.217 179.897,284.217 179.897,230.338 169.618,230.338 ; 169.478,222.333 179.83,222.333 179.83,168.679 169.551,168.679 ; 170.086,254.687 172.552,254.687 172.552,259.687 170.086,259.687 ; 170.109,192.998 172.575,192.998 172.575,197.998 170.109,197.998 ; 170.142,69.715 172.608,69.715 172.608,74.715 170.142,74.715 ; 170.182,131.404 172.648,131.404 172.648,136.404 170.182,136.404
  lines w1.5: 165.039,87.055 185.039,87.055 ; 165.177,271.953 185.177,271.953 ; 165.181,57.229 185.181,57.229 ; 165.24,210.164 185.24,210.164 ; 165.309,148.644 185.309,148.644 ; 165.394,242.501 185.394,242.501 ; 165.457,180.912 185.457,180.912 ; 165.576,119.142 185.576,119.142
  lines w3: 165.161,72.289 185.161,72.289 ; 165.374,257.286 185.374,257.286 ; 165.437,195.497 185.437,195.497 ; 165.531,133.877 185.531,133.877
  text "1_G" at 181.687,280.696 h2
  text "1_E" at 181.687,274.696 h2
  text "2_G" at 181.687,267.799 h2
  text "2_E" at 181.687,261.209 h2
  text "3_G" at 181.687,252.439 h2
  text "3_E" at 181.687,245.849 h2
  text "4_G" at 181.687,238.109 h2
  text "4_E" at 181.687,231.519 h2
  text "5_G" at 181.687,219.497 h2
  text "5_E" at 181.687,212.907 h2
  text "6_G" at 181.687,206.01 h2
  text "6_E" at 181.687,199.42 h2
  text "7_G" at 181.687,190.65 h2
  text "7_E" at 181.687,184.06 h2
  text "8_G" at 181.687,176.32 h2
  text "8_E" at 181.687,169.73 h2
  text "9_G" at 182.108,157.752 h2
  text "9_E" at 182.108,151.162 h2
  text "10_G" at 182.108,144.265 h2
  text "10_E" at 182.108,137.675 h2
  text "GND VCC" at 3.054,128.996 h1.2 r270
  text "11_G" at 182.108,128.905 h2
  text "11_E" at 182.108,122.315 h2
  text "12_G" at 182.108,114.575 h2
  text "12_E" at 182.108,107.985 h2
  text "13_G" at 182.108,96.289 h2
  text "13_E" at 182.108,89.699 h2
  text "14_G" at 182.108,82.801 h2
  text "14_E" at 182.108,76.211 h2
  text "5V" at 48.588,70.886 h0.8 r90
  text "V3V" at 51.151,70.886 h0.8 r90
  text "SDA" at 53.668,70.886 h0.8 r90
  text "SCL" at 55.974,70.886 h0.8 r90
  text "GND" at 58.698,70.886 h0.8 r90
  text "5V" at 18.715,68.355 h0.8
  text "GND" at 3.349,67.779 h0.8 r90
  text "DIR" at 4.699,67.779 h0.8 r90
  text "RX" at 6.149,67.779 h0.8 r90
  text "TX" at 7.541,67.779 h0.8 r90
  text "5V" at 8.896,67.779 h0.8 r90
  text "V3V" at 10.129,67.779 h0.8 r90
  text "15_G" at 182.108,67.441 h2
  text "5V" at 67.361,67.286 h0.8
  text "J48" at 12.554,67.079 h0.8 r90
  text "CS" at 18.586,65.636 h0.8
  text "SDA" at 66.801,65.165 h0.8
  text "SCK" at 17.986,63.211 h0.8
  text "SCL" at 66.85,63.165 h0.8
  text "GND" at 3.374,62.781 h0.8 r90
  text "LED_3" at 4.591,62.781 h0.8 r90
  text "LED_2" at 6.041,62.781 h0.8 r90
  text "LED_1" at 7.433,62.781 h0.8 r90
  text "5V" at 8.921,62.781 h0.8 r90
  text "V3V" at 10.154,62.781 h0.8 r90
  text "J53" at 12.554,62.335 h0.8 r90
  text "GND" at 66.801,61.165 h0.8
  text "15_E" at 182.108,60.851 h2
  text "MISO" at 17.336,60.711 h0.8
  text "MOSI" at 17.261,58.061 h0.8
  text "P12" at 12.554,57.879 h0.8 r90
  text "GND" at 4.724,57.656 h0.8 r90
  text "LED_3" at 6.041,57.656 h0.8 r90
  text "LED_2" at 7.433,57.656 h0.8 r90
  text "LED_1" at 8.788,57.656 h0.8 r90
  text "5V" at 10.154,57.656 h0.8 r90
  text "GND" at 17.876,55.395 h0.8
  text "GND" at 67.336,54.636 h0.8
  text "GND" at 3.374,53.779 h0.8 r90
  text "RX" at 4.724,53.779 h0.8 r90
  text "TX" at 6.174,53.779 h0.8 r90
  text "CLK" at 7.566,53.779 h0.8 r90
  text "DIO" at 8.921,53.779 h0.8 r90
  text "V3V" at 10.154,53.779 h0.8 r90
  text "J52" at 12.554,53.77 h0.8 r90
  text "16_G" at 182.108,53.111 h2
  text "TIM1" at 67.125,52.175 h0.8
  text "5V" at 67.125,49.385 h0.8
  text "16_E" at 182.108,46.521 h2
  text "GND" at 26.231,45.934 h0.8
  text "GND" at 67.586,45.836 h0.8
  text "5V" at 79.986,45.836 h0.8
  text "TIM2" at 67.226,43.345 h0.8
  text "DC/RS" at 26.325,43.302 h0.8
  text "SENS_1" at 79.284,43.287 h0.8
  text "D_RST" at 26.325,40.896 h0.8
  text "GND" at 79.463,40.712 h0.8
  text "5V" at 66.972,40.214 h0.8
  text "GND" at 97.509,39.796 h0.8
  text "D_LED" at 26.325,38.211 h0.8
  text "ADC3" at 97.232,37.149 h0.8
  text "GND" at 67.511,36.986 h0.8
  text "5V" at 80.036,36.961 h0.8
  text "D_INT" at 26.701,35.455 h0.8
  text "SENS_2" at 79.284,34.692 h0.8
  text "HALL_A" at 66.622,34.439 h0.8
  text "GND" at 97.634,33.696 h0.8
  text "5V" at 26.701,33.501 h0.8
  text "GND" at 79.513,31.837 h0.8
  text "5V" at 66.875,31.757 h0.8
  text "ADC4" at 97.222,30.729 h0.8
  text "5V" at 80.111,28.336 h0.8
  text "GND" at 67.486,28.261 h0.8
  text "A" at 197.454,26.254 h1.52
  text "HALL_B" at 66.672,25.664 h0.8
  text "SENS_3" at 79.634,25.569 h0.8
  text "GND" at 79.588,23.212 h0.8
  text "5V" at 66.66,22.705 h0.8
  text "G" at 197.454,21.154 h1.52
  text "GND" at 42.115,20.939 h0.8 r90
  text "V3V" at 29.098,20.886 h0.8 r90
  text "LED_4" at 39.125,20.885 h0.8 r90
  text "LED_5" at 36.719,20.814 h0.8 r90
  text "LED_7" at 31.554,20.715 h0.8 r90
  text "LED_6" at 34.094,20.715 h0.8 r90
  text "GND" at 66.485,20.446 h0.8
  text "5V" at 80.161,19.536 h0.8
  text "SENS_4" at 79.713,16.887 h0.8
  text "HALL_C" at 66.603,16.777 h0.8
  text "DIO" at 12.654,16.711 h0.8 r90
  text "GND" at 7.528,16.511 h0.8 r90
  text "CLK" at 9.996,16.511 h0.8 r90
  text "V3V" at 15.253,16.461 h0.8 r90
  text "B" at 197.454,15.479 h1.52
  text "GND" at 79.713,14.112 h0.8
  text "5V" at 66.485,13.98 h0.8
  text "GND" at 46.278,11.461 h0.8 r90
  text "UI_INT" at 49.22,8.811 h0.8 r90
  text "5V" at 97.171,7.379 h0.8 r90
  text "GND" at 101.696,6.629 h0.8 r90
  text "OUT_N1" at 98.488,4.604 h0.8 r90
  text "OUT_P1" at 100.188,4.604 h0.8 r90

## Text inside footprints (layer, text, board x,y; h text height)
P10: Top Overlay "1" at 58.492,66.132 h1.02
P12: Top Overlay "1" at 2.047,31.496 h1.02 r90
U1: Top Overlay "-18V_1" at 63.859,146.875 h1.3 r270; Top Overlay "-18V_1" at 66.399,146.875 h1.3 r270; Top Overlay "+18V_1" at 68.939,146.875 h1.3 r270; Top Overlay "+18V_1" at 71.479,146.875 h1.3 r270; Top Overlay "+18V_2" at 28.3,147.154 h1.3 r270; Top Overlay "+18V_2" at 30.84,147.154 h1.3 r270; Top Overlay "-18V_2" at 33.38,147.154 h1.3 r270; Top Overlay "-18V_2" at 35.92,147.154 h1.3 r270; Top Overlay "+12V" at 53.266,146.058 h1.3 r270; Top Overlay "GND" at 45.647,145.418 h1.3 r270; Top Overlay "GND" at 48.187,145.418 h1.3 r270; Top Overlay "+12V" at 50.726,146.058 h1.3 r270; Bottom Overlay "+18V_2" at 28.3,140.388 h1.3 r270; Bottom Overlay "+18V_2" at 30.84,140.388 h1.3 r270; Bottom Overlay "-18V_2" at 33.38,140.388 h1.3 r270; Bottom Overlay "-18V_2" at 35.92,140.389 h1.3 r270; Bottom Overlay "GND" at 45.647,142.124 h1.3 r270; Bottom Overlay "GND" at 48.187,142.124 h1.3 r270; Bottom Overlay "+12V" at 50.726,141.484 h1.3 r270; Bottom Overlay "+12V" at 53.266,141.484 h1.3 r270; Bottom Overlay "-18V_1" at 63.859,140.667 h1.3 r270; Bottom Overlay "-18V_1" at 66.399,140.667 h1.3 r270; Bottom Overlay "+18V_1" at 68.939,140.667 h1.3 r270; Bottom Overlay "+18V_1" at 71.479,140.667 h1.3 r270
U6: Top Overlay "+12V" at 50.836,272.058 h1.3 r270; Top Overlay "GND" at 48.297,271.418 h1.3 r270; Top Overlay "GND" at 45.757,271.418 h1.3 r270; Top Overlay "+12V" at 53.376,272.058 h1.3 r270; Top Overlay "-18V_2" at 36.03,273.154 h1.3 r270; Top Overlay "-18V_2" at 33.49,273.154 h1.3 r270; Top Overlay "+18V_2" at 30.95,273.154 h1.3 r270; Top Overlay "+18V_2" at 28.41,273.154 h1.3 r270; Top Overlay "+18V_1" at 71.589,272.875 h1.3 r270; Top Overlay "+18V_1" at 69.049,272.875 h1.3 r270; Top Overlay "-18V_1" at 66.509,272.875 h1.3 r270; Top Overlay "-18V_1" at 63.969,272.875 h1.3 r270; Bottom Overlay "+18V_1" at 71.589,266.667 h1.3 r270; Bottom Overlay "+18V_1" at 69.049,266.667 h1.3 r270; Bottom Overlay "-18V_1" at 66.509,266.667 h1.3 r270; Bottom Overlay "-18V_1" at 63.969,266.667 h1.3 r270; Bottom Overlay "+12V" at 53.376,267.484 h1.3 r270; Bottom Overlay "+12V" at 50.836,267.484 h1.3 r270; Bottom Overlay "GND" at 48.297,268.124 h1.3 r270; Bottom Overlay "GND" at 45.757,268.124 h1.3 r270; Bottom Overlay "-18V_2" at 36.03,266.389 h1.3 r270; Bottom Overlay "-18V_2" at 33.49,266.388 h1.3 r270; Bottom Overlay "+18V_2" at 30.95,266.388 h1.3 r270; Bottom Overlay "+18V_2" at 28.41,266.388 h1.3 r270
U41: Top Overlay "-18V_1" at 63.908,172.875 h1.3 r270; Top Overlay "-18V_1" at 66.448,172.875 h1.3 r270; Top Overlay "+18V_1" at 68.988,172.875 h1.3 r270; Top Overlay "+18V_1" at 71.528,172.875 h1.3 r270; Top Overlay "+18V_2" at 28.35,173.154 h1.3 r270; Top Overlay "+18V_2" at 30.89,173.154 h1.3 r270; Top Overlay "-18V_2" at 33.43,173.154 h1.3 r270; Top Overlay "-18V_2" at 35.97,173.154 h1.3 r270; Top Overlay "+12V" at 53.315,172.058 h1.3 r270; Top Overlay "GND" at 45.697,171.418 h1.3 r270; Top Overlay "GND" at 48.237,171.418 h1.3 r270; Top Overlay "+12V" at 50.775,172.058 h1.3 r270; Bottom Overlay "+18V_2" at 28.35,166.388 h1.3 r270; Bottom Overlay "+18V_2" at 30.89,166.388 h1.3 r270; Bottom Overlay "-18V_2" at 33.43,166.388 h1.3 r270; Bottom Overlay "-18V_2" at 35.97,166.389 h1.3 r270; Bottom Overlay "GND" at 45.697,168.124 h1.3 r270; Bottom Overlay "GND" at 48.237,168.124 h1.3 r270; Bottom Overlay "+12V" at 50.775,167.484 h1.3 r270; Bottom Overlay "+12V" at 53.315,167.484 h1.3 r270; Bottom Overlay "-18V_1" at 63.908,166.667 h1.3 r270; Bottom Overlay "-18V_1" at 66.448,166.667 h1.3 r270; Bottom Overlay "+18V_1" at 68.988,166.667 h1.3 r270; Bottom Overlay "+18V_1" at 71.528,166.667 h1.3 r270
U42: Top Overlay "-18V_1" at 63.919,196.875 h1.3 r270; Top Overlay "-18V_1" at 66.459,196.875 h1.3 r270; Top Overlay "+18V_1" at 68.999,196.875 h1.3 r270; Top Overlay "+18V_1" at 71.539,196.875 h1.3 r270; Top Overlay "+18V_2" at 28.36,197.154 h1.3 r270; Top Overlay "+18V_2" at 30.9,197.154 h1.3 r270; Top Overlay "-18V_2" at 33.44,197.154 h1.3 r270; Top Overlay "-18V_2" at 35.98,197.154 h1.3 r270; Top Overlay "+12V" at 53.326,196.058 h1.3 r270; Top Overlay "GND" at 45.707,195.418 h1.3 r270; Top Overlay "GND" at 48.247,195.418 h1.3 r270; Top Overlay "+12V" at 50.786,196.058 h1.3 r270; Bottom Overlay "+18V_2" at 28.36,190.388 h1.3 r270; Bottom Overlay "+18V_2" at 30.9,190.388 h1.3 r270; Bottom Overlay "-18V_2" at 33.44,190.388 h1.3 r270; Bottom Overlay "-18V_2" at 35.98,190.389 h1.3 r270; Bottom Overlay "GND" at 45.707,192.124 h1.3 r270; Bottom Overlay "GND" at 48.247,192.124 h1.3 r270; Bottom Overlay "+12V" at 50.786,191.484 h1.3 r270; Bottom Overlay "+12V" at 53.326,191.484 h1.3 r270; Bottom Overlay "-18V_1" at 63.919,190.667 h1.3 r270; Bottom Overlay "-18V_1" at 66.459,190.667 h1.3 r270; Bottom Overlay "+18V_1" at 68.999,190.667 h1.3 r270; Bottom Overlay "+18V_1" at 71.539,190.667 h1.3 r270